# Altium PCB Orion_PCB.PcbDoc (part 1 of 2)
Units mil, origin at the board's own origin, x right, y up, seen from the top; angles counter-clockwise.
Board outline 3401 x 1998 mil, 2 copper layers (Top Layer, Bottom Layer); 64 components, 48 nets, 235 pads, 54 vias.
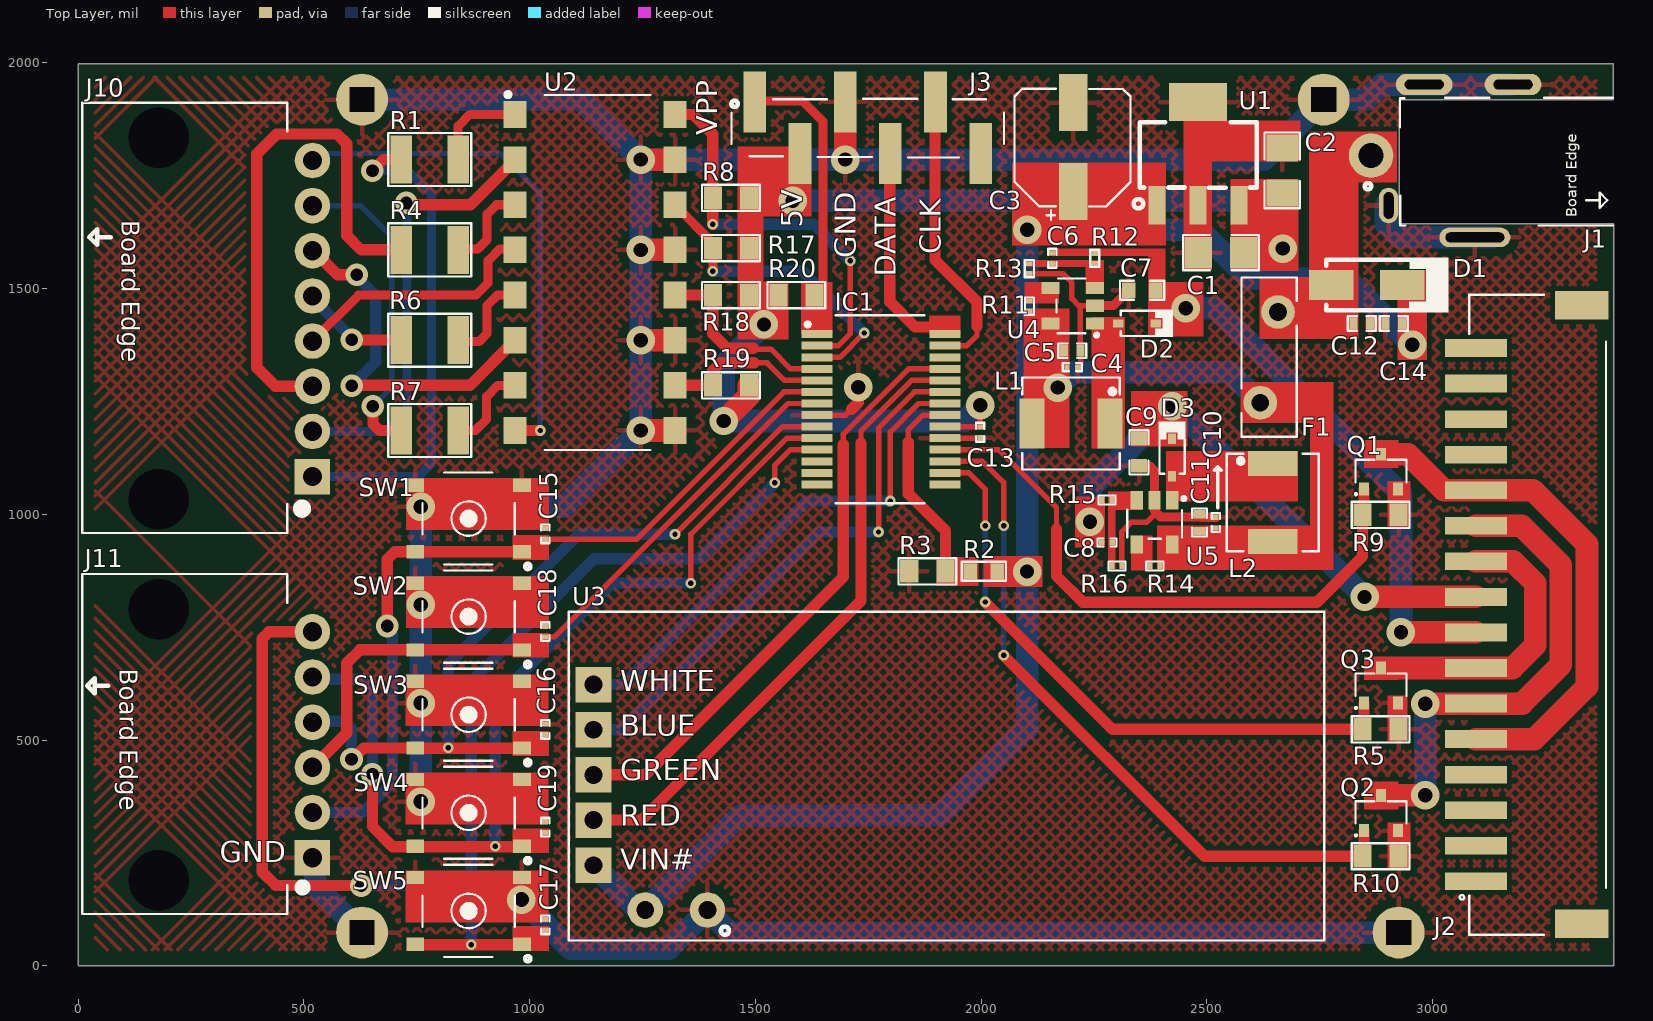
[diagram p0: Top Layer view]
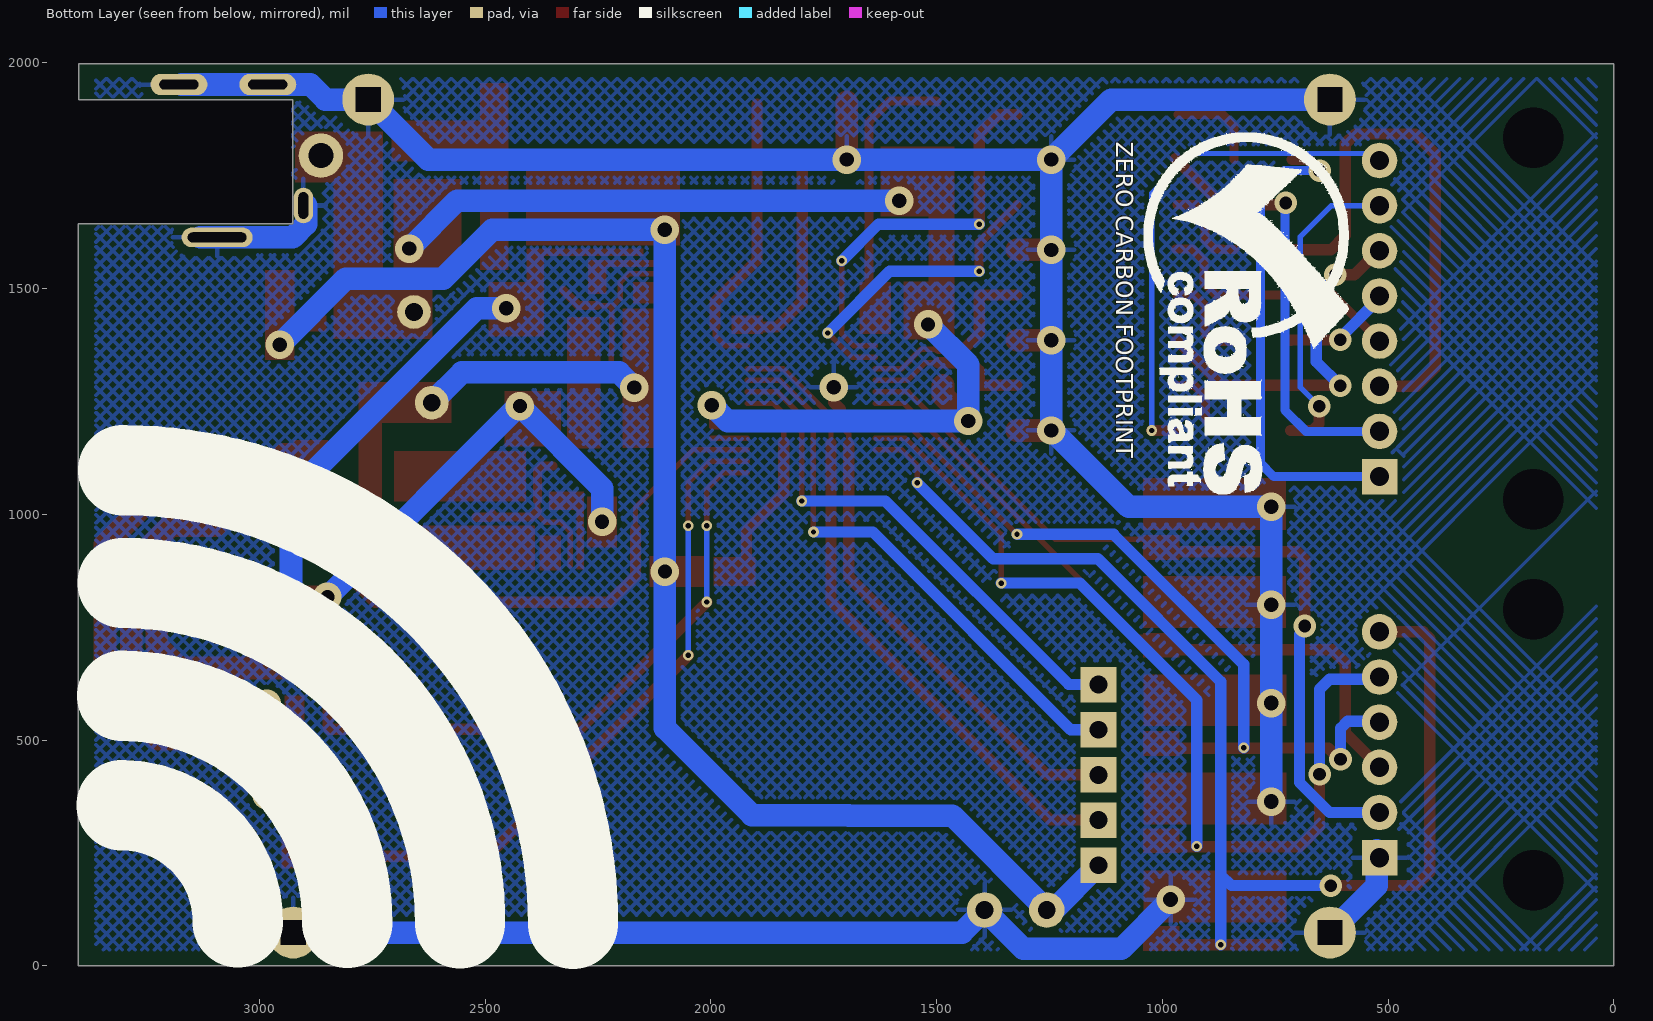
[diagram p1: Bottom Layer view, seen from below]
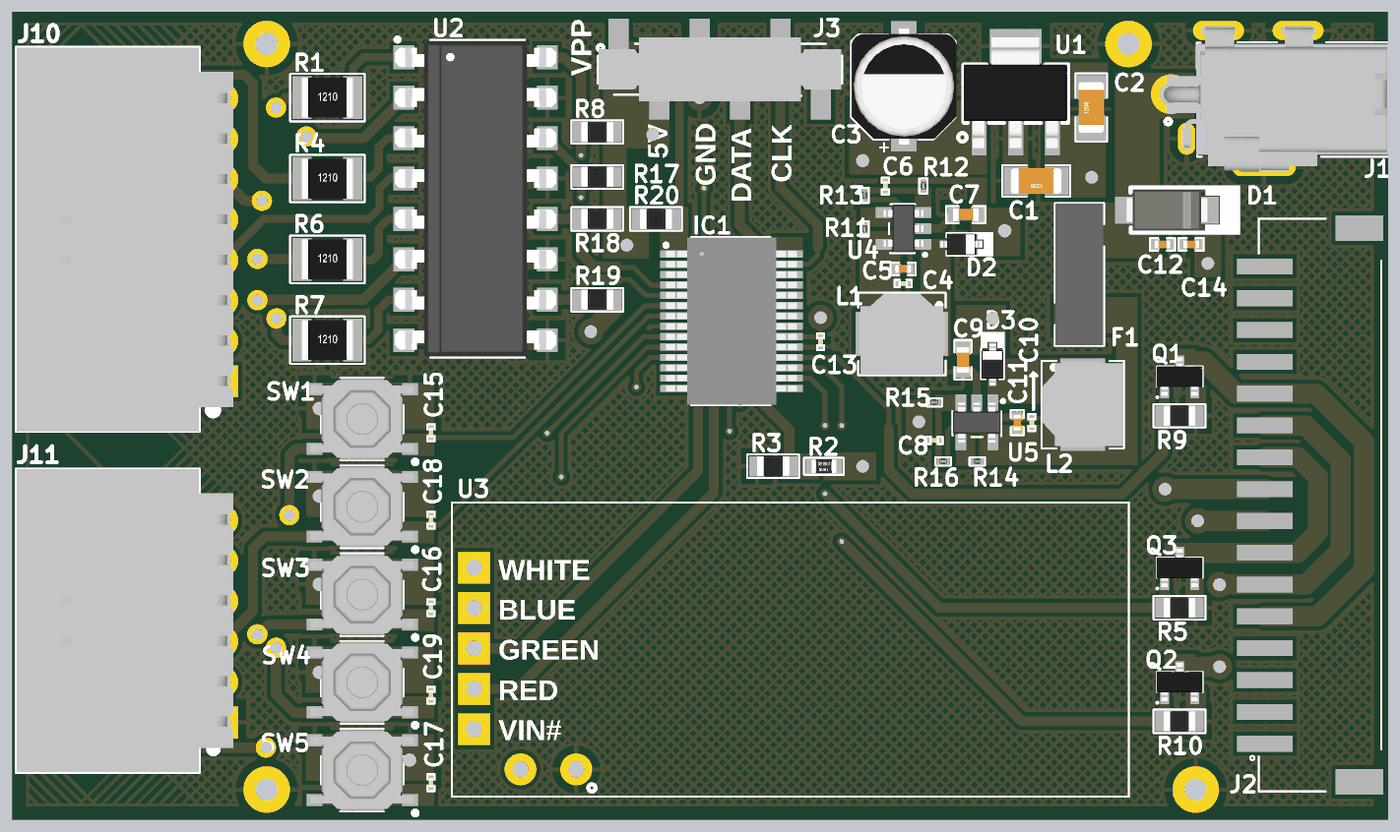
[diagram p2: 3D render of the assembled board from above, using the file's embedded part models]

## Layer stack, top to bottom
Top Solder: solder mask 0.4, Solder Resist, Dk 3.5
Top Layer: signal copper 1.4
Dielectric 1: dielectric 12.6, FR-4, Dk 4.8
Bottom Layer: signal copper 1.4
Bottom Solder: solder mask 0.4, Solder Resist, Dk 3.5

## Board outline
0,0 0,1998 3400,1998 3400,1919 2926,1919 2926,1644 3401,1644 3401,0

## Design rules (kind name [scope] priority, off if disabled: settings)
Clearance [All] p1: gap=7 ignorepadtopadclearanceinfootprint=FALSE except(10: Arc-Poly Track-Poly SMDPad-Poly THPad-Poly Via-Poly Fill-Poly Poly-Poly)
ComponentClearance [All] p1: gap=0 collisioncheckmode=3 verticalgap=0 showdistances=FALSE
Height [All] p1: minheight=0 maxheight=10000 prefheight=500
HoleSize [All] p1: absolutevalues=TRUE maxlimit=1000 minlimit=1 maxpercent=80.000 minpercent=20.000
HoleToHoleClearance [All] p1: gap=0 allowstackedmicrovias=TRUE
MinimumSolderMaskSliver [All] p1: minsoldermaskwidth=0
PlaneConnect [All] p1: planeconnectstyle=Relief reliefexpansion=20 reliefentries=4 reliefconductorwidth=10 reliefairgap=20
PolygonConnect [All] p1: connectstyle=Relief reliefconductorwidth=10 reliefentries=4 polygonreliefangle="90 Angle" airgapwidth=20
RoutingVias [All] p1: holewidth=11.81 width=23.62 viastyle="Through Hole" minholewidth=7.87 minwidth=15.75 maxholewidth=31.5 maxwidth=62.99
SilkToSilkClearance [All] p1: silktosilkclearance=0
SilkToSolderMaskClearance [IsPad] p1: minsilkscreentomaskgap=0 clearancetoexposedcopper=TRUE
SolderMaskExpansion SolderMaskExpansion_1 [Not IsVia] p1: expansion=4 istentingtop=FALSE
SolderMaskExpansion [IsVia] p2: expansion=4 istentingtop=FALSE soldermaskfromhole=TRUE
Width [All] p1: maxlimit=100 minlimit=10 preferedwidth=12 minimp=50.000000 maximp=50.000000 favimp=50.000000
22 further rules are at their usual default settings.

## Classes and differential pairs
component class U_Switching_Section: C15 C16 C17 C18 C19 Q1 Q2 Q3 R5 R9 R10 SW1 SW2 SW3 SW4 SW5
component class U_Processing_Section: C13 IC1 R1 R2 R3 R4 R6 R7 R8 R17 R18 R19 R20 U2
component class U_Power_Section: C1 C2 C3 C4 C5 C6 C7 C8 C9 C10 C11 D2 D3 L1 L2 R11 R12 R13 R14 R15 R16 U1 U4 U5
component class U_Connector_Section: C12 C14 D1 F1 J1 J2 J3 J10 J11 U3

## Components (designator, comment, footprint, x,y, rotation, side; value= is the part's Value field where it differs from the comment)
C1 "10000PF" Cap1206 2531,1580 r180 top locked
C2 "10000PF" Cap1206 2667,1762 r90 top locked
C3 "33uF" EEE-HB1E330AP 2204,1814 r90 top locked
C4 "0.1uF" "CAP 0201" 2202,1326.42 r0 top locked
C5 "2.2uF" Cap0402 2202,1362.42 r0 top locked
C6 "220pF" "CAP 0201" 2158,1567.42 r270 top locked
C7 "4.7uF" Cap0603 2356.88,1496.42 r180 top locked
C8 "220pF" "CAP 0201" 2279,938 r0 top locked
C9 "4.7uF" Cap0603 2350,1137.43 r270 top locked
C10 "0.1uF" "CAP 0201" 2520,982 r90 top locked
C11 "2.2uF" Cap0402 2484,982 r90 top locked
C12 "0.1uF" Cap0402 2843,1423 r0 top locked
C13 "0.1uF" "CAP 0201" 1998,1182 r270 top locked
C14 "0.1uF" Cap0402 2914,1423 r180 top locked
C15 "0.1uF" "CAP 0201" 1035,957 r90 top locked
C16 "0.1uF" "CAP 0201" 1035,524 r90 top locked
C17 "0.1uF" "CAP 0201" 1035,91 r90 top locked
C18 "0.1uF" "CAP 0201" 1035,740.5 r90 top locked
C19 "0.1uF" "CAP 0201" 1035,307.5 r90 top locked
D1 "M7" SMA 2854,1508 r0 top locked value=Custom
D2 "SDM2U20SD3-7" SDM2U20SD3-7 2345.46,1423.42 r0 top locked
D3 "SDM2U20SD3-7" SDM2U20SD3-7 2423,1126 r90 top locked
F1 "30R135UPR" 30R135UPR 2638,1348 r270 top locked
IC1 "PIC16F15355-I/SS" PIC16F15355-I/SS 1778,1233 r0 top locked
J1 "DC-C024E-7A-1.65" DC-C024E-7A-1.65 3021,1783 r180 top
J2 "0220164-162121" 0220164-162121 3213.13,778.07 r90 top locked
J3 "95293-401A06LF" 95293-401A06LF 1749,1856.48 r0 top locked
J10 "0705510042" 0705510042 61.08,1256 r270 top
J11 "0705510040" 0705510040 349.08,515 r270 top
L1 "10uH" SPM5012T-100M-LR 2199,1201.42 r180 top locked
L2 "10uH" SPM5012T-100M-LR 2646,1026.61 r270 top locked
Q1 "SQ2308CES-T1_BE3" SQ2308CES-T1_BE3 2848.2,1056 r0 top locked
Q2 "SQ2308CES-T1_BE3" SQ2308CES-T1_BE3 2848.2,300 r0 top locked
Q3 "SQ2308CES-T1_BE3" SQ2308CES-T1_BE3 2848.2,582.52 r0 top locked
R1 "560R" "RES 1210" 779,1786 r0 top locked
R2 "14K" Res0603 2006,874 r0 top locked
R3 "10K" "RES 0805" 1881,874 r180 top locked value=10kΩ
R4 "560R" "RES 1210" 779,1586 r0 top locked
R5 "10K" "RES 0805" 2885,524 r180 top locked value=10kΩ
R6 "560R" "RES 1210" 779,1386 r0 top locked
R7 "560R" "RES 1210" 779,1186 r0 top locked
R8 "10K" "RES 0805" 1446,1701 r180 top locked value=10kΩ
R9 "10K" "RES 0805" 2885,999 r180 top locked value=10kΩ
R10 "10K" "RES 0805" 2885,243 r180 top locked value=10kΩ
R11 "51K" Res-0201 2107,1461.42 r90 top locked
R12 "715K" Res-0201 2252,1567.42 r90 top locked
R13 "13K" Res-0201 2107,1544.42 r270 top locked
R14 "51K" Res-0201 2385,886 r180 top
R15 "715K" Res-0201 2279,1032 r180 top locked
R16 "13K" Res-0201 2301,886 r0 top
R17 "10K" "RES 0805" 1446,1590 r180 top locked value=10kΩ
R18 "10K" "RES 0805" 1446,1486 r180 top locked value=10kΩ
R19 "10K" "RES 0805" 1446,1286 r180 top locked value=10kΩ
R20 "10K" "RES 0805" 1591,1486 r0 top locked value=10kΩ
SW1 "TS-1187A-C-G-B" TS-1187A-C-G-B 865,991 r180 top locked
SW2 "TS-1187A-C-G-B" TS-1187A-C-G-B 865,773.75 r180 top locked
SW3 "TS-1187A-C-G-B" TS-1187A-C-G-B 865,556.5 r180 top locked
SW4 "TS-1187A-C-G-B" TS-1187A-C-G-B 865,339.25 r180 top locked
SW5 "TS-1187A-C-G-B" TS-1187A-C-G-B 865,122 r180 top locked
U1 "UA78M05IDCYR" UA78M05IDCYR 2480.45,1799.17 r0 top locked
U2 "LTV-844S" LTV-844S 1145.17,1536 r0 top locked
U3 "ESP8285" ESP8285 1141.64,623.21 r270 top locked
U4 "LMR62014XMF/NOPB" SOT23-5 2203,1462.42 r180 top locked
U5 "LMR62014XMF/NOPB" SOT23-5 2384,982.21 r270 top locked

## Footprints (in the part's own frame and the unit in brackets; to place one, negate y for a bottom-side part, rotate by r counter-clockwise, add the part's x,y. Pads: shape width x height; smd on the part's side, far side on the other; paste and mask are expansions set on the pad)
30R135UPR [mm]
  round 1.894 hole 1: 1(-2.55,0.5) 2(2.55,-0.5)
  silkscreen extent -4.5,-1.55 4.47,1.55, body extent -4.48,-1.5 4.42,1.5, height 13.6
95293-401A06LF [mm]
  rect 1.27x3.43 smd: 1(-6.35,1.46) 2(-3.81,-1.46) 3(-1.27,1.46) 4(1.27,-1.46) 5(3.81,1.46) 6(6.35,-1.46)
  silkscreen extent -7.67,-1.68 7.67,1.63, body extent -7.62,-2.64 7.62,2.64, height 9.65
0220164-162121 [mm]
  rect 1x3.5 smd: 1(-15,2.975) 2(-13,2.975) 3(-11,2.975) 4(-9,2.975) 5(-7,2.975) 6(-5,2.975) 7(-3,2.975) 8(-1,2.975) 9(1,2.975) 10(3,2.975) 11(5,2.975) 12(7,2.975) 13(9,2.975) 14(11,2.975) 15(13,2.975) 16(15,2.975)
  rect 1.6x3 smd: MP1(-17.4,-2.975) MP2(17.4,-2.975)
  silkscreen extent -18,-4.35 18,3.89
0705510040 [mm]
  rect 2x2 hole 1.09: 1(6.985,4.32)
  round 2 hole 1.09: 2(4.445,4.32) 3(1.905,4.32) 4(-0.635,4.32) 5(-3.175,4.32) 6(-5.715,4.32)
  round 0 hole 3.4 unplated: MH1(-6.985,-4.32) MH2(8.255,-4.32)
  silkscreen extent -8.97,-8.64 10.16,3.96, body extent -8.94,-8.58 10.11,5, height 7.06
0705510042 [mm]
  rect 2x2 hole 1.09: 1(4.369,11.635)
  round 2 hole 1.09: 2(1.829,11.635) 3(-0.711,11.635) 4(-3.251,11.635) 5(-5.791,11.635) 6(-8.331,11.635) 7(-10.871,11.635) 8(-13.411,11.635)
  round 0 hole 3.4 unplated: MH1(-14.681,2.995) MH2(5.639,2.995)
  silkscreen extent -16.66,-1.32 7.54,11.31, body extent -16.61,-1.27 7.52,12.32, height 7.06
Cap0402 [mil]
  rect 18x25 smd mask+2.36: 1(-18.5,0) 2(18.5,0)
  silkscreen extent -31,-16 31,16, body extent -20,-10 20,10, height 19
Cap0603 [mil]
  rect 30x35 smd mask+2.36: 1(-30,0) 2(30,0)
  silkscreen extent -49,-21 49,21, body extent -32,-16 31,16, height 34
Cap1206 [mil] "SMD 1206"
  rect 60x70 smd: 1(-50,0) 2(50,0)
  silkscreen extent -84,-39 84,39, body extent -63,-31 63,32, height 39
"CAP 0201" [mm]
  rect 0.3x0.3 smd mask+0.055: 1(-0.3,0) 2(0.3,0)
  silkscreen extent -0.53,-0.23 0.53,0.23, body extent -0.3,-0.15 0.3,0.15, height 0.28
DC-C024E-7A-1.65 [mm]
  round 2.5 hole 1.4: 1(3.995,-0.3)
  oval 4x1.1 hole 0.55 slot 3.3 at 0 deg: 2(-1.845,4.3)
  oval 1.1x2 hole 0.55 slot 1.5 at 90 deg: 3(3.005,2.507)
  oval 3.2x1.2 hole 0.55 slot 2.2 at 0 deg: 4(-3.995,-4.3) 5(1.005,-4.3)
  silkscreen extent -9.6,-3.56 4.34,3.63, body extent -9.57,-4.48 4.43,4.52, height 5.05
EEE-HB1E330AP [mm] "CAP ALUM 33UF 20% 25V SMD"
  rect 3.2x1.6 smd: 1(-2.5,0) 2(2.5,0)
  silkscreen extent -4.1,-3.23 3.27,3.3, body extent -3.65,-3.3 3.65,3.3, height 5.8
ESP8285 [mm]
  round 2 hole 1: 1(12.68,6.41) 2(12.68,2.91)
  rect 2x2 hole 1: 3(10.16,0) 4(7.62,0) 5(5.08,0) 6(2.54,0) 7(0,0)
  silkscreen extent -4.1,-1.4 14.4,41.1
LTV-844S [mm]
  rect 1.3x1.5 smd: 1(-4.5,8.89) 2(-4.5,6.35) 3(-4.5,3.81) 4(-4.5,1.27) 5(-4.5,-1.27) 6(-4.5,-3.81) 7(-4.5,-6.35) 8(-4.5,-8.89) 9(4.5,-8.89) 10(4.5,-6.35) 11(4.5,-3.81) 12(4.5,-1.27) 13(4.5,1.27) 14(4.5,3.81) 15(4.5,6.35) 16(4.5,8.89)
  silkscreen extent -5.03,-9.98 3.1,10.14, body extent -5.08,-9.92 5.08,9.92, height 4.6
PIC16F15355-I/SS [mm]
  rect 1.75x0.45 smd: 1(-3.6,4.225) 2(-3.6,3.575) 3(-3.6,2.925) 4(-3.6,2.275) 5(-3.6,1.625) 6(-3.6,0.975) 7(-3.6,0.325) 8(-3.6,-0.325) 9(-3.6,-0.975) 10(-3.6,-1.625) 11(-3.6,-2.275) 12(-3.6,-2.925) 13(-3.6,-3.575) 14(-3.6,-4.225) 15(3.6,-4.225) 16(3.6,-3.575) 17(3.6,-2.925) 18(3.6,-2.275) 19(3.6,-1.625) 20(3.6,-0.975) 21(3.6,-0.325) 22(3.6,0.325) 23(3.6,0.975) 24(3.6,1.625) 25(3.6,2.275) 26(3.6,2.925) 27(3.6,3.575) 28(3.6,4.225)
  silkscreen extent -4.22,-5.28 2.44,5.28, body extent -4.1,-5.24 4.1,5.24, height 2.01
Res0603 [mil]
  rect 30x35 smd: 1(-30,0) 2(30,0)
  silkscreen extent -49,-21 49,21, body extent -31,-17 31,17, height 18
"RES 0805" [mil] "SMD 0805"
  rect 40x50 smd: 1(-40,0) 2(40,0)
  silkscreen extent -64,-29 64,29, body extent -39,-25 39,24, height 24
"RES 1210" [mm] "560 OHM"
  rect 1.2x2.7 smd: 1(-1.6,0) 2(1.6,0)
  silkscreen extent -2.34,-1.49 2.34,1.49, body extent -1.6,-1.25 1.6,1.25, height 0.6
Res-0201 [mm]
  rect 0.27x0.37 smd: 1(-0.275,0) 2(0.275,0)
  silkscreen extent -0.48,-0.25 0.48,0.25, body extent -0.3,-0.15 0.3,0.15, height 0.29
SDM2U20SD3-7 [mm]
  rect 0.59x0.45 smd: 1(-1.055,0) 2(1.055,0)
  silkscreen extent -0.91,-0.76 2.03,0.76, body extent -1.3,-0.68 1.3,0.67, height 1.1
SMA [mm] "DIODE GEN PURP 50V 1A SMA"
  rect 2.5x1.7 smd: 1(-2,0) 2(2,0)
  silkscreen extent -2.29,-1.55 4.6,1.55, body extent -2.6,-1.3 2.6,1.3, height 2.3
SOT23-5 [mil] "SOT23-5 Package"
  rect 40x27 smd: 1(-49.21,39.37) 2(-49.21,0) 3(-49.21,-39.37) 4(49.21,-39.37) 5(49.21,39.37)
  silkscreen extent -56,-60 36,68, body extent -49,-59 49,59, height 43
SPM5012T-100M-LR [mm]
  rect 1.4x2.8 smd: 1(-2.2,0) 2(2.2,0)
  silkscreen extent -2.74,-2.59 2.74,2.59, body extent -2.7,-2.55 2.7,2.55, height 1.16
SQ2308CES-T1_BE3 [mm] "MOSFET N-CHANNEL 60V (D-S)"
  rect 0.559x0.724 smd: 1(0,0) 2(1.9,0) 3(0.95,1.968)
  silkscreen extent -0.51,-0.34 2.39,1.65, body extent -0.51,-0.18 2.39,2.22, height 1.1
TS-1187A-C-G-B [mm]
  rect 1x0.75 smd: 1(-3,1.875) 2(3,1.875) 3(-3,-1.875) 4(3,-1.875)
  silkscreen extent -3.48,-2.59 2.59,2.84, body extent -3.25,-2.55 3.25,2.55, height 3.5
UA78M05IDCYR [mm]
  rect 0.95x2.15 smd: 1(-2.3,-2.9) 2(0,-2.9) 3(2.3,-2.9)
  rect 3.25x2.15 smd: 4(0,2.9)
  silkscreen extent -3.62,-3.08 3.3,1.75, body extent -3.28,-3.51 3.22,3.45, height 1.65

## Part data
C1: library part CC1206KRX7R0BB103, "CAP CER 10000PF 100V X7R 1206", Capacitance=10nF, Case/Package=1206, Case Code (Metric)=3216, Dielectric=X7R, Insulation Resistance=10GR, Manufacturer=Yageo, Max Operating Temperature=125°C, Min Operating Temperature=-55°C, Package Quantity=4000, Resistor Type=Ceramic, Supplier Part Number 1=311-1985-1-ND, Tolerance=10%, Voltage=100V, Case Code (Imperial)=1206, Category="Ceramic Capacitors", ComponentLink1Description=https://datasheet.ciiva.com/15375/upy-gp-np0-16v-to-50v-8-15375877.pdf?src-supplier=Mouser, ComponentLink1URL=https://datasheet.ciiva.com/15375/upy-gp-np0-16v-to-50v-8-15375877.pdf?src-supplier=Mouser, ComponentLink2Description=https://datasheet.ciiva.com/16744/upy-np0x7r-mv-100-to-630v-9-16744582.pdf?src-supplier=Future+Electronics, ComponentLink2URL=https://datasheet.ciiva.com/16744/upy-np0x7r-mv-100-to-630v-9-16744582.pdf?src-supplier=Future+Electronics, ComponentLink3Description=https://datasheet.ciiva.com/15189/getdatasheetpartid-315568-15189269.pdf?src-supplier=Verical, ComponentLink3URL=https://datasheet.ciiva.com/15189/getdatasheetpartid-315568-15189269.pdf?src-supplier=Verical, ComponentLink4Description=https://datasheet.ciiva.com/16624/upy-np0x7r-mv-100-to-630v-9-16624629.pdf?src-supplier=Avnet+Europe, ComponentLink4URL=https://datasheet.ciiva.com/16624/upy-np0x7r-mv-100-to-630v-9-16624629.pdf?src-supplier=Avnet+Europe, ComponentLink5Description=https://datasheet.ciiva.com/11466/upy-np0x7r-mv-100-to-630v-9-11466717.pdf?src-supplier=Avnet, ComponentLink5URL=https://datasheet.ciiva.com/11466/upy-np0x7r-mv-100-to-630v-9-11466717.pdf?src-supplier=Avnet, Depth=1.6mm, Dissipation Factor=2.5%, Height=0.85mm, Lead Free="Lead Free", Length=3.2mm, Manufacturer Part Number=CC1206KRX7R0BB103, Mount="Surface Mount", Number of Pins=2, Packaging="Tape and Reel", Pricing 1="1=0.28000, 10=0.18900, 50=0.11320, 100=0.09560, 500=0.06542, 1000=0.05787 (USD)", Radiation Hardening=No, RoHS=Yes, RoHS Compliant=Yes, Series=CC, Stock 1=7045, Supplier 1=Digi-Key, Termination=SMD/SMT, Thickness=0.057inch, Voltage Rating=100V, Voltage Rating (DC)=100V, Width=1.6mm
C2: library part CC1206KRX7R0BB103, "CAP CER 10000PF 100V X7R 1206", Capacitance=10nF, Case Code (Imperial)=1206, Case Code (Metric)=3216, Dielectric=X7R, Insulation Resistance=10GR, Manufacturer=Yageo, Max Operating Temperature=125°C, Min Operating Temperature=-55°C, Package Quantity=4000, Resistor Type=Ceramic, Supplier Part Number 1=311-1985-1-ND, Tolerance=10%, Voltage=100V, Case/Package=1206, Category="Ceramic Capacitors", ComponentLink1Description=https://datasheet.ciiva.com/15375/upy-gp-np0-16v-to-50v-8-15375877.pdf?src-supplier=Mouser, ComponentLink1URL=https://datasheet.ciiva.com/15375/upy-gp-np0-16v-to-50v-8-15375877.pdf?src-supplier=Mouser, ComponentLink2Description=https://datasheet.ciiva.com/16744/upy-np0x7r-mv-100-to-630v-9-16744582.pdf?src-supplier=Future+Electronics, ComponentLink2URL=https://datasheet.ciiva.com/16744/upy-np0x7r-mv-100-to-630v-9-16744582.pdf?src-supplier=Future+Electronics, ComponentLink3Description=https://datasheet.ciiva.com/15189/getdatasheetpartid-315568-15189269.pdf?src-supplier=Verical, ComponentLink3URL=https://datasheet.ciiva.com/15189/getdatasheetpartid-315568-15189269.pdf?src-supplier=Verical, ComponentLink4Description=https://datasheet.ciiva.com/16624/upy-np0x7r-mv-100-to-630v-9-16624629.pdf?src-supplier=Avnet+Europe, ComponentLink4URL=https://datasheet.ciiva.com/16624/upy-np0x7r-mv-100-to-630v-9-16624629.pdf?src-supplier=Avnet+Europe, ComponentLink5Description=https://datasheet.ciiva.com/11466/upy-np0x7r-mv-100-to-630v-9-11466717.pdf?src-supplier=Avnet, ComponentLink5URL=https://datasheet.ciiva.com/11466/upy-np0x7r-mv-100-to-630v-9-11466717.pdf?src-supplier=Avnet, Depth=1.6mm, Dissipation Factor=2.5%, Height=0.85mm, Lead Free="Lead Free", Length=3.2mm, Manufacturer Part Number=CC1206KRX7R0BB103, Mount="Surface Mount", Number of Pins=2, Packaging="Tape and Reel", Pricing 1="1=0.28000, 10=0.18900, 50=0.11320, 100=0.09560, 500=0.06542, 1000=0.05787 (USD)", Radiation Hardening=No, RoHS=Yes, RoHS Compliant=Yes, Series=CC, Stock 1=7045, Supplier 1=Digi-Key, Termination=SMD/SMT, Thickness=0.057inch, Voltage Rating=100V, Voltage Rating (DC)=100V, Width=1.6mm
C3: library part EEE-HB1E330AP, "CAP ALUM 33UF 20% 25V SMD", Case/Package=Radial, Leakage Current=3uA, Manufacturer=Panasonic, Max Operating Temperature=105°C, Min Operating Temperature=-40°C, Package Quantity=1, Ripple Current=65mA, Supplier Part Number 1=PCE4755CT-ND, Tolerance=20%, Voltage=25V, Capacitance=33uF, Category="Aluminum Electrolytic Capacitors", ComponentLink1Description=https://datasheet.ciiva.com/11780/0900766b80bed47d-11780811.pdf?src-supplier=RSComponents, ComponentLink1URL=https://datasheet.ciiva.com/11780/0900766b80bed47d-11780811.pdf?src-supplier=RSComponents, ComponentLink2Description=https://datasheet.ciiva.com/2985/aba0000ce117-2985840.pdf?src-supplier=Avnet, ComponentLink2URL=https://datasheet.ciiva.com/2985/aba0000ce117-2985840.pdf?src-supplier=Avnet, ComponentLink3Description=https://datasheet.ciiva.com/17536/aba0000ce117-17536184.pdf?src-supplier=Avnet+Europe, ComponentLink3URL=https://datasheet.ciiva.com/17536/aba0000ce117-17536184.pdf?src-supplier=Avnet+Europe, ComponentLink4Description=https://datasheet.ciiva.com/10331/aba0000ce117-10331117.pdf?src-supplier=Avnet, ComponentLink4URL=https://datasheet.ciiva.com/10331/aba0000ce117-10331117.pdf?src-supplier=Avnet, Construction=Cylindrical, Diameter=6.3mm, Height=5.8mm, Height - Seated (Max)=0.228inch, Lead Free="Lead Free", Length=6.1mm, Life (Hours)=2000Hour, Manufacturer Part Number=EEE-HB1E330AP, Mount="Surface Mount", Packaging="Tape and Reel", Pricing 1="1=0.52000, 10=0.35900, 50=0.25160, 100=0.21560, 500=0.16172 (USD)", Radiation Hardening=No, RoHS=Yes, RoHS Compliant=Yes, Series=HB, Stock 1=27, Supplier 1=Digi-Key, Termination=SMD/SMT, Voltage Rating=25V, Voltage Rating (DC)=25V
C4 C10 C13 C15 C16 C17 C18 C19: library part GRM033R61E104KE14D, "CAP CER 0.1UF 25V X5R 0201", Capacitance=100nF, Case Code (Imperial)=0201, Case Code (Metric)=0603, Dielectric=X5R, Manufacturer=Murata, Max Operating Temperature=85°C, Min Operating Temperature=-55°C, Package Quantity=15000, Resistor Type=Ceramic, Supplier Part Number 1=81-GRM033R61E104KE4D, Tolerance=10%, Voltage Rating=25V, Case/Package=0201, Category="Ceramic Capacitors", ComponentLink1Description=http://www.farnell.com/datasheets/2867843.pdf?src-supplier=Farnell, ComponentLink1URL=http://www.farnell.com/datasheets/2867843.pdf?src-supplier=Farnell, ComponentLink2Description=http://www.mouser.com/ds/2/281/c02e-2905.pdf?src-supplier=Mouser, ComponentLink2URL=http://www.mouser.com/ds/2/281/c02e-2905.pdf?src-supplier=Mouser, ComponentLink3Description=http://search.murata.co.jp/Ceramy/image/img/A01X/G101/ENG/GRM033R61E104KE14-01.pdf?src-supplier=Digi-Key, ComponentLink3URL=http://search.murata.co.jp/Ceramy/image/img/A01X/G101/ENG/GRM033R61E104KE14-01.pdf?src-supplier=Digi-Key, ComponentLink4Description=http://www.farnell.com/datasheets/2867843.pdf?src-supplier=Newark, ComponentLink4URL=http://www.farnell.com/datasheets/2867843.pdf?src-supplier=Newark, Height=0.3mm, Lead Free="Lead Free", Length=0.024inch, Manufacturer Part Number=GRM033R61E104KE14D, Mount="Surface Mount", Packaging="Tape and Reel", Pricing 1="1=0.12000, 10=0.05600, 50=0.05600, 100=0.02500, 1000=0.01400, 10000=0.01100 (USD)", RoHS=Yes, RoHS Compliant=Yes, Stock 1=19728, Supplier 1=Mouser, Termination=SMD/SMT, Thickness=0.013inch, Voltage Rating (DC)=25V, Weight=1.2E-05oz, Width=0.012inch
C5 C11: library part C1005X5R1E225KT000E, "CAP CER 2.2UF 25V X5R 0402", Case Code (Imperial)=0402, Case Code (Metric)=1005, Dielectric=X5R, Dielectric Material=Ceramic, Manufacturer=TDK, Manufacturer Part Number=C1005X5R1E225K050BC, Max Operating Temperature=85°C, Min Operating Temperature=-55°C, Package Quantity=1, Supplier Part Number 1=445-9090-1-ND, Tolerance=10%, Voltage Rating=25V, Capacitance=2.2uF, Case/Package=0402, Category="Ceramic Capacitors", ComponentLink1Description=https://datasheet.ciiva.com/24217/c1005x5r1e225k050bc-264404-24217075.pdf?src-supplier=Mouser, ComponentLink1URL=https://datasheet.ciiva.com/24217/c1005x5r1e225k050bc-264404-24217075.pdf?src-supplier=Mouser, ComponentLink2Description=https://datasheet.ciiva.com/6276/tdkmlcccaprange-6276808.pdf?src-supplier=Digi-Key, ComponentLink2URL=https://datasheet.ciiva.com/6276/tdkmlcccaprange-6276808.pdf?src-supplier=Digi-Key, ComponentLink3Description=https://datasheet.ciiva.com/6276/tdkmlcccaprange-6276806.pdf?src-supplier=Digi-Key, ComponentLink3URL=https://datasheet.ciiva.com/6276/tdkmlcccaprange-6276806.pdf?src-supplier=Digi-Key, ComponentLink4Description=https://datasheet.ciiva.com/6276/tdkmlcccaprange-6276810.pdf?src-supplier=Digi-Key, ComponentLink4URL=https://datasheet.ciiva.com/6276/tdkmlcccaprange-6276810.pdf?src-supplier=Digi-Key, Depth=0.5mm, Height=0.5mm, Lead Free="Lead Free", Length=1mm, Mount="Surface Mount", Packaging="Tape and Reel", Pricing 1="1=0.31000, 10=0.21000, 50=0.13980, 100=0.11890, 500=0.08390, 1000=0.07342, 2500=0.06992, 5000=0.06468 (USD)", REACH SVHC="No SVHC", Resistor Type=Ceramic, RoHS=Yes, RoHS Compliant=Yes, Series=C, Stock 1=655450, Supplier 1=Digi-Key, Termination=SMD/SMT, Thickness=0.022inch, Voltage Rating (DC)=25V, Weight=2.3E-05oz, Width=0.5mm
C6 C8: library part C0603X7R221KGT, "50V 220pF X7R ±10% 0201 Multilayer Ceramic Capacitors MLCC - SMD/SMT ROHS", Manufacturer="Darfon Elec", ComponentLink1Description="New link", ComponentLink1URL=https://www.lcsc.com/product-detail/Multilayer-Ceramic-Capacitors-MLCC-SMD-SMT_Darfon-Elec-C0603X7R221KGT_C258475.html, Manufacturer Part No=C0603X7R221KGT
C7 C9: library part C1608X5R1E475K080AC, "CAP CER 4.7UF 25V X5R 0603", Case Code (Imperial)=0603, Case Code (Metric)=1608, Dielectric=X5R, Dielectric Material=Ceramic, Manufacturer=TDK, Max Operating Temperature=85°C, Min Operating Temperature=-55°C, Package Quantity=4000, Supplier Part Number 1=445-9050-1-ND, Tolerance=10%, Voltage Rating=25V, Capacitance=4.7uF, Case/Package=0603, Category="Ceramic Capacitors", ComponentLink1Description=https://datasheet.ciiva.com/48587/6print-detail-pdf-phplangenpart-noc1608x5r1e475k080acimp-unit-xmhz-48587141.pdf?src-supplier=Onlinecomponents.com, ComponentLink1URL=https://datasheet.ciiva.com/48587/6print-detail-pdf-phplangenpart-noc1608x5r1e475k080acimp-unit-xmhz-48587141.pdf?src-supplier=Onlinecomponents.com, ComponentLink2Description=https://datasheet.ciiva.com/24216/mlcc-commercial-general-en-24216326.pdf?src-supplier=Mouser, ComponentLink2URL=https://datasheet.ciiva.com/24216/mlcc-commercial-general-en-24216326.pdf?src-supplier=Mouser, ComponentLink3Description=https://datasheet.ciiva.com/48671/mlcc-commercial-general-en-48671304.pdf?src-supplier=Avnet, ComponentLink3URL=https://datasheet.ciiva.com/48671/mlcc-commercial-general-en-48671304.pdf?src-supplier=Avnet, Depth=0.8mm, Height=0.8mm, Lead Free="Lead Free", Length=1.6mm, Manufacturer Part Number=C1608X5R1E475K080AC, Mount="Surface Mount", Packaging="Tape and Reel", Pricing 1="1=0.36000, 10=0.25000, 50=0.17460, 100=0.14970, 500=0.11230, 1000=0.09483 (USD)", REACH SVHC="No SVHC", Resistor Type=Ceramic, RoHS=Yes, Stock 1=495198, Supplier 1=Digi-Key, Termination=SMD/SMT, Thickness=0.039inch, Voltage Rating (DC)=25V, Weight=7.1E-05oz, Width=0.031inch
C12 C14: library part C1005X5R1H104K050BB, "CAP CER 0.1UF 50V X5R 0402", Capacitance=100nF, Case Code (Imperial)=0402, Case Code (Metric)=1005, Dielectric=X5R, Dielectric Material=Ceramic, Manufacturer=TDK, Max Operating Temperature=85°C, Min Operating Temperature=-55°C, Package Quantity=1, Supplier Part Number 1=445-5942-1-ND, Tolerance=10%, Voltage=50V, Case/Package=0402, ComponentLink1Description=https://product.tdk.com/info/en/catalog/spec/mlccspec_commercial_general_midvoltage_en.pdf?src-supplier=Digi-Key, ComponentLink1URL=https://product.tdk.com/info/en/catalog/spec/mlccspec_commercial_general_midvoltage_en.pdf?src-supplier=Digi-Key, ComponentLink2Description=http://www.tdk.co.jp/tefe02/e413_c.pdf?src-supplier=Future+Electronics, ComponentLink2URL=http://www.tdk.co.jp/tefe02/e413_c.pdf?src-supplier=Future+Electronics, ComponentLink3Description=https://www.verical.com/server-webapp/html/getDatasheet?partID=743571&src-supplier=Verical, ComponentLink3URL=https://www.verical.com/server-webapp/html/getDatasheet?partID=743571&src-supplier=Verical, ComponentLink4Description=http://www.tdk.co.jp/tefe02/e412_c.pdf?src-supplier=Avnet+Europe, ComponentLink4URL=http://www.tdk.co.jp/tefe02/e412_c.pdf?src-supplier=Avnet+Europe, Construction=Flat, Depth=0.5mm, Height=0.5mm, Lead Free="Lead Free", Length=1mm, Manufacturer Part Number=C1005X5R1H104K050BB, Mount="Surface Mount", Packaging="Tape and Reel", Pricing 1="1=0.12, 10=0.09, 50=0.049, 100=0.04, 500=0.02858, 1000=0.02245, 2500=0.02041, 5000=0.01878 (USD)", Radiation Hardening=No, REACH SVHC="No SVHC", Resistor Type=Ceramic, RoHS Compliant=Yes, Series=C, Stock 1=1455182, Supplier 1=Digi-Key, Termination=SMD/SMT, Thickness=0.022inch, Voltage Rating=50V, Voltage Rating (DC)=50V, Weight=2.3E-05oz, Width=0.02inch
D1: "1A 5μA 1kV 1kV 1.1V 1A SMA(DO-214AC) Diodes - General Purpose ROHS", Manufacturer=Slkor, Package=SMA, ComponentLink1Description=LCSC, ComponentLink1URL=https://lcsc.com/product-detail/Diodes-General-Purpose_Slkor-SLKORMICRO-Elec-M7_C426571.html, Manufacturer Part No=M7
D2 D3: "DIODE SCHOTTKY 20V 2A SOD323", Average Rectified Current=2A, Manufacturer=Diodes, Max Reverse Voltage (DC)=20V, Supplier Part Number 1=SDM2U20SD3-7DICT-ND, Category="Rectifier Diodes", ComponentLink1Description=http://www.mouser.com/ds/2/115/SDM2U20SD3-537776.pdf?src-supplier=Mouser, ComponentLink1URL=http://www.mouser.com/ds/2/115/SDM2U20SD3-537776.pdf?src-supplier=Mouser, ComponentLink2Description=https://www.diodes.com/assets/Datasheets/SDM2U20SD3.pdf?src-supplier=Digi-Key, ComponentLink2URL=https://www.diodes.com/assets/Datasheets/SDM2U20SD3.pdf?src-supplier=Digi-Key, ComponentLink3Description=http://diodes.com/datasheets/SDM2U20SD3.pdf?src-supplier=Avnet, ComponentLink3URL=http://diodes.com/datasheets/SDM2U20SD3.pdf?src-supplier=Avnet, Manufacturer Part Number=SDM2U20SD3-7, Mount="Surface Mount", Packaging="Cut Tape", Pricing 1="1=0.47000, 10=0.35200, 100=0.19930, 500=0.13200, 1000=0.10120 (USD)", RoHS=Yes, RoHS Compliant=Yes, Stock 1=6, Supplier 1=Digi-Key
F1: "PTC RESET FUSE 30V 1.35A RADIAL", Case/Package=Radial, Current Rating=40A, Hold Current=1.35A, Manufacturer=Littelfuse, Max Operating Temperature=85°C, Max Voltage Rating (DC)=30V, Min Operating Temperature=-40°C, Package Quantity=2000, Power Dissipation=800mW, Resistance=130mR, Supplier Part Number 1=576-30R135UPR, Trip Current=2.7A, Approvals=cULus,TUV, Category="PTC Resettable Fuses", ComponentLink1Description=https://datasheet.ciiva.com/325/littelfuse-ptc-30r-325859.pdf?src-supplier=Digi-Key, ComponentLink1URL=https://datasheet.ciiva.com/325/littelfuse-ptc-30r-325859.pdf?src-supplier=Digi-Key, ComponentLink2Description=https://datasheet.ciiva.com/325/littelfuse-ptc-30r-325860.pdf?src-supplier=Digi-Key, ComponentLink2URL=https://datasheet.ciiva.com/325/littelfuse-ptc-30r-325860.pdf?src-supplier=Digi-Key, ComponentLink3Description=https://datasheet.ciiva.com/14119/gklittelfuse-30r-e-14119724.pdf?src-supplier=Distrelec, ComponentLink3URL=https://datasheet.ciiva.com/14119/gklittelfuse-30r-e-14119724.pdf?src-supplier=Distrelec, Height=13.5mm, Lead Free="Lead Free", Lead Pitch=5.1mm, Manufacturer Part Number=30R135UPR, Max Current Rating=40A, Packaging="Tape and Reel", Pricing 1="1=0.53000, 10=0.42700, 50=0.42700, 100=0.32300, 1000=0.24200, 10000=0.23100 (USD)", RoHS=Yes, RoHS Compliant=Yes, Series="POLY-FUSE®, 30R", Stock 1=4973, Supplier 1=Mouser, Termination=Radial, Thickness=3.05mm, Time to Trip=7.3s, Width=8.89mm
IC1: "IC MCU 8BIT 14KB FLASH 28SSOP", Case/Package=SSOP, Frequency=32MHz, Manufacturer=Microchip, Max Operating Temperature=85°C, Min Operating Temperature=-40°C, Supplier Part Number 1=PIC16F15355-I/SS-ND, Category=Microcontrollers, ComponentLink1Description=http://www.microchip.com/mymicrochip/filehandler.aspx?ddocname=en585524&src-supplier=Digi-Key, ComponentLink1URL=http://www.microchip.com/mymicrochip/filehandler.aspx?ddocname=en585524&src-supplier=Digi-Key, Core Architecture=PIC, Interface=I2C,SPI,UART,USART, Manufacturer Part Number=PIC16F15355-I/SS, Memory Size=14KB, Memory Type=FLASH, Number of I/Os=25, Oscillator Type=Internal, Packaging=Rail/Tube, Peripherals="Brown-out Detect/Reset,POR,PWM,WDT", Pricing 1="1=1.39000, 25=1.27640, 100=1.15500 (USD)", RoHS=Yes, RoHS Compliant=Yes, Stock 1=36, Supplier 1=Digi-Key
J1: "DC Power Receptacle 1.65mm 4.3mm 7A 24V Plugin AC/DC Power Connectors ROHS", Package=Custom, Manfacturer="XKB Connectivity", Maunfacturer Part No=DC-C024E-7A-1.65
J2: "16 Pin Right angle JST Conn 2 mm Pitch", ComponentLink1Description=Datasheet, ComponentLink1URL=http://www.kaweei.com/indexdata/pic/2017072520595473499.pdf
J3: "CONN HEADER SMD 6POS 2.54MM", Color=Black, Manufacturer="Amphenol ICC / FCI", Max Operating Temperature=125°C, Max Voltage Rating (AC)=1.5kV, Min Operating Temperature=-65°C, Package Quantity=520, Supplier Part Number 1=609-4398-1-ND, Category="Headers and Wire Housings", ComponentLink1Description=https://datasheet.ciiva.com/739/95293-739282.pdf?src-supplier=Digi-Key, ComponentLink1URL=https://datasheet.ciiva.com/739/95293-739282.pdf?src-supplier=Digi-Key, ComponentLink2Description=https://datasheet.ciiva.com/739/95293-739276.pdf?src-supplier=Digi-Key, ComponentLink2URL=https://datasheet.ciiva.com/739/95293-739276.pdf?src-supplier=Digi-Key, ComponentLink3Description=https://datasheet.ciiva.com/739/95293-739268.pdf?src-supplier=Digi-Key, ComponentLink3URL=https://datasheet.ciiva.com/739/95293-739268.pdf?src-supplier=Digi-Key, ComponentLink4Description=https://datasheet.ciiva.com/16733/95293-16733007.pdf?src-supplier=Avnet+Europe, ComponentLink4URL=https://datasheet.ciiva.com/16733/95293-16733007.pdf?src-supplier=Avnet+Europe, Connector Type="Male Pin", Contact Material=Bronze, Contact Mating Length=0.23inch, Contact Plating=Tin, Contact Type="Male Pin", Depth=2.4mm, Housing Color=Black, Housing Material=Thermoplastic, Lead Free="Lead Free", Length=15.24mm, Manufacturer Part Number=95293-401A06LF, Mount="Surface Mount", Number of Contacts=6, Number of Positions=6, Number of Rows=1, Orientation=Straight, Packaging="Tape and Reel", Pitch=2.54mm, Pricing 1="1=3.32000, 10=3.01700, 100=2.65840 (USD)", Radiation Hardening=No, RoHS=Yes, RoHS Compliant=Yes, Series="BERGSTIK®, MezzSelect™, Basics+", Stock 1=8979, Supplier 1=Digi-Key, Termination=Solder
J10: "Conn Shrouded Header HDR 8 POS 2.54mm Solder RA Thru-Hole SL™ Tube", Color=Black, Contact Resistance=15mR, Manufacturer=Molex, Max Operating Temperature=105°C, Min Operating Temperature=-40°C, Supplier Part Number 1=WM20418-ND, Category="Headers and Wire Housings", ComponentLink1Description=http://components.arrow.com/part/dataview/2934385S6164661N3303?src-supplier=Arrow+Electronics, ComponentLink1URL=http://components.arrow.com/part/dataview/2934385S6164661N3303?src-supplier=Arrow+Electronics, ComponentLink2Description=http://www.molex.com/pdm_docs/sd/705510001_sd.pdf?src-supplier=Digi-Key, ComponentLink2URL=http://www.molex.com/pdm_docs/sd/705510001_sd.pdf?src-supplier=Digi-Key, Connector Type="Male Pin", Contact Material="Copper Alloy", Contact Mating Length=0.24inch, Contact Plating=Gold, Depth=13.59mm, Fastening Type=Latch, Housing Color=Black, Housing Material=Polyester, Manufacturer Part Number=0705510042, Mount="Through Hole", Number of Positions=8, Number of Rows=1, Orientation="Right Angle", Packaging=Rail/Tube, Pitch=0.1inch, Pricing 1="1=2.63000, 10=2.31400, 100=1.84100, 1000=1.52539, 5000=1.36759 (USD)", RoHS=Yes, Supplier 1=Digi-Key, Termination=Solder
J11: "CONN HEADER R/A 6POS 2.54MM", Color=Black, Contact Resistance=15mR, Manufacturer=Molex, Max Operating Temperature=105°C, Min Operating Temperature=-40°C, Package Quantity=1120, Supplier Part Number 1=WM21002-ND, Category="Headers and Wire Housings", ComponentLink1Description=http://components.arrow.com/part/dataview/2934387S8722778N3303?src-supplier=Arrow+Electronics, ComponentLink1URL=http://components.arrow.com/part/dataview/2934387S8722778N3303?src-supplier=Arrow+Electronics, ComponentLink2Description=https://www.molex.com/pdm_docs/sd/705510001_sd.pdf?src-supplier=Digi-Key, ComponentLink2URL=https://www.molex.com/pdm_docs/sd/705510001_sd.pdf?src-supplier=Digi-Key, Connector Type="Male Pin", Contact Material="Copper Alloy", Contact Mating Length=0.24inch, Contact Plating=Gold, Depth=13.59mm, Fastening Type=Latch, Housing Color=Black, Housing Material=Polyester, Manufacturer Part Number=0705510040, Mount="Through Hole", Number of Contacts=6, Number of Positions=6, Number of Rows=1, Orientation="Right Angle", Packaging=Rail/Tube, Pitch=2.54mm, Pricing 1="1=2.52000, 28=2.14929, 84=1.77560, 952=1.40175, 4900=1.24600 (USD)", Radiation Hardening=No, RoHS=Yes, Stock 1=1707, Supplier 1=Digi-Key, Termination=Solder
L1 L2: library part SPM5012T-100M-LR, "FIXED IND 10UH 1.3A 390.5MOHM SM", Case/Package=Nonstandard, Current Rating=1.3A, DC Resistance (DCR)=390.5mR, Manufacturer=TDK, Max Operating Temperature=125°C, Min Operating Temperature=-40°C, Resistor Type=Wirewound, Saturation Current=2.2A, Supplier Part Number 1=445-174487-1-ND, Test Frequency=100kHz, Tolerance=20%, Category="Fixed Inductors", ComponentLink1Description=https://product.tdk.com/info/en/catalog/datasheets/inductor_commercial_power_spm5012-lr_en.pdf?src-supplier=Digi-Key, ComponentLink1URL=https://product.tdk.com/info/en/catalog/datasheets/inductor_commercial_power_spm5012-lr_en.pdf?src-supplier=Digi-Key, Core Material=Metal, Height - Seated (Max)=0.047inch, Inductance=10uH, Length=0.126inch, Manufacturer Part Number=SPM5012T-100M-LR, Mount="Surface Mount", Packaging="Tape and Reel", Pricing 1="1=1.50000, 10=1.39400, 25=1.28720, 50=1.07240, 100=1.00820, 250=0.90088, 500=0.77220 (USD)", RoHS=Yes, RoHS Compliant=Yes, Shielding=Shielded, Stock 1=765, Supplier 1=Digi-Key, Width=0.118inch
Q1 Q2 Q3: "MOSFET N-CHANNEL 60V (D-S)", Manufacturer=Vishay, Supplier Part Number 1=80AH8959, Manufacturer Part Number=SQ2308CES-T1_BE3, Pricing 1="1=0.64000, 25=0.50800, 50=0.45700, 100=0.40600, 250=0.36300, 500=0.31900 (USD)", RoHS=No, Stock 1=2862, Supplier 1=Avnet
R1 R4 R6 R7: library part RC1210FR-07560RL, "RES 560 OHM 1% 1/2W 1210", Case/Package=1210, Case Code (Metric)=3225, Manufacturer=Yageo, Max Operating Temperature=155°C, Max Power Dissipation=500mW, Min Operating Temperature=-55°C, Resistor Type="Thick Film", Supplier Part Number 1=13-RC1210FR-07560RLCT-ND, Temperature Coefficient=100ppm/°C, Tolerance=1%, Voltage Rating=200V, Case Code (Imperial)=1210, Category="Chip SMD Resistors", ComponentLink1Description=https://datasheet.ciiva.com/12575/pyu-rc1210-51-rohs-l-4-12575621.pdf?src-supplier=Mouser, ComponentLink1URL=https://datasheet.ciiva.com/12575/pyu-rc1210-51-rohs-l-4-12575621.pdf?src-supplier=Mouser, Construction=Rectangular, Depth=2.6mm, Features="Moisture Resistant", Height=0.024inch, Lead Free="Lead Free", Length=3.1mm, Manufacturer Part Number=RC1210FR-07560RL, Military Standard=Not, Number of Terminations=2, Packaging="Tape and Reel", Power Rating=500mW, Pricing 1="1=0.17000, 10=0.14900, 100=0.05740, 1000=0.02525, 2500=0.02181 (USD)", Resistance=560R, RoHS=Yes, RoHS Compliant=Yes, Series=RC, Size Code=1210, Supplier 1=Digi-Key, Termination=SMD/SMT, Width=2.6mm
R2: library part RT0603BRE0714KL, "RES SMD 0603 14kOhm 0.1% Paper T/R", Case/Package=0603, Manufacturer=Yageo, Max Operating Temperature=155°C, Max Power Dissipation=100mW, Min Operating Temperature=-55°C, Resistance=14kR, Resistor Type="Thin Film", Supplier Part Number 1=RT0603BRE0714KL-ND, Temperature Coefficient=50ppm/°C, Tolerance=0.1%, Voltage Rating (DC)=50V, Category="Chip SMD Resistors", ComponentLink1Description=http://components.arrow.com/part/dataview/0323_03292491?src-supplier=Arrow+Europe, ComponentLink1URL=http://components.arrow.com/part/dataview/0323_03292491?src-supplier=Arrow+Europe, ComponentLink2Description=http://www.yageo.com/documents/recent/PYu-RT_1-to-0.01_RoHS_L_9.pdf?src-supplier=Digi-Key, ComponentLink2URL=http://www.yageo.com/documents/recent/PYu-RT_1-to-0.01_RoHS_L_9.pdf?src-supplier=Digi-Key, Construction=Rectangular, Depth=0.8mm, Lead Free="Lead Free", Length=1.6mm, Manufacturer Part Number=RT0603BRE0714KL, Military Standard=Not, Number of Terminations=2, Packaging="Tape and Reel", Power Rating=100mW, Pricing 1="5000=0.04543 (USD)", RoHS=Yes, RoHS Compliant=Yes, Series=RT, Supplier 1=Digi-Key, Width=800um
R3 R5 R8 R9 R10 R17 R18 R19 R20: library part 0805W8F1002T5E, "±1% 1/8W Thick Film Resistors 150V ±100ppm/℃ -55℃~+155℃ 10kΩ 0805 Chip Resistor - Surface Mount ROHS", Manufacturer=UNI-ROYAL, Package=0805, Manufacturer Part No=0805W8F1002T5E
R11 R14: library part 0201WMF5102TEE, "51kΩ 0201 Chip Resistor", Manufacturer="Uni Royal", ComponentLink1Description="New link", ComponentLink1URL=https://www.lcsc.com/product-detail/Chip-span-style-background-color-ff0-Resistor-span-Surface-Mount_UNI-ROYAL-Uniroyal-Elec-0201WMF5102TEE_C473471.html, Manufacturer Part No=0201WMF5102TEE
R12 R15: library part 0201WMF7153TEE, "715kΩ 0201 Chip Resistor", Manufacturer="Uni Royal", ComponentLink1Description="New link", ComponentLink1URL=https://www.lcsc.com/product-detail/Chip-Resistor-Surface-Mount_UNI-ROYAL-Uniroyal-Elec-0201WMF7153TEE_C620454.html, Manufacturer Part No=0201WMF7153TEE
R13 R16: library part NQ01WMJ0133TEE, "13kΩ 0201 Chip Resistor", Manufacturer="Uni Royal", ComponentLink1Description="New link", ComponentLink1URL=https://lcsc.com/product-detail/Chip-Resistor-Surface-Mount_UNI-ROYAL-Uniroyal-Elec-NQ01WMJ0133TEE_C965341.html, Manufacturer Part No=NQ01WMJ0133TEE
SW1 SW2 SW3 SW4 SW5: "5.1mm 3.5mm Round Button 50mA To 5.1mm SPST 12V SMD Tactile Switche", Manufacturer=XKB, Package=Custom, ComponentLink1Description=LCSC, ComponentLink1URL=https://lcsc.com/product-detail/Tactile-Switches_XKB-Enterprise-TS-1187A-C-G-A_C318886.html, Manufacturer Part No=TS-1187A-C-G-B
U1: "IC REG LINEAR 5V 500MA SOT223-4", Case/Package=SOT-223-4, Dropout Voltage=2V, Manufacturer="Texas Instruments", Max Input Voltage=25V, Max Operating Temperature=125°C, Max Output Current=500mA, Min Input Voltage=7V, Min Operating Temperature=-40°C, Nominal Output Voltage=5V, Package Quantity=1, Power Supply Rejection Ratio (PSRR)=80dB, Quiescent Current=4.5mA, Supplier Part Number 1=296-17616-6-ND, Category="Voltage Regulators - Linear", ComponentLink1Description=https://datasheet.ciiva.com/46429/1849874-46429894.pdf?src-supplier=Element14, ComponentLink1URL=https://datasheet.ciiva.com/46429/1849874-46429894.pdf?src-supplier=Element14, ComponentLink2Description=https://datasheet.ciiva.com/14274/ua78m05-14274743.pdf?src-supplier=Avnet, ComponentLink2URL=https://datasheet.ciiva.com/14274/ua78m05-14274743.pdf?src-supplier=Avnet, ComponentLink3Description=https://datasheet.ciiva.com/2042/ua78m05-2042251.pdf?src-supplier=Digi-Key, ComponentLink3URL=https://datasheet.ciiva.com/2042/ua78m05-2042251.pdf?src-supplier=Digi-Key, ComponentLink4Description=https://datasheet.ciiva.com/2042/ua78m05-2042252.pdf?src-supplier=Digi-Key, ComponentLink4URL=https://datasheet.ciiva.com/2042/ua78m05-2042252.pdf?src-supplier=Digi-Key, ComponentLink5Description=https://datasheet.ciiva.com/2042/ua78m05-2042253.pdf?src-supplier=Digi-Key, ComponentLink5URL=https://datasheet.ciiva.com/2042/ua78m05-2042253.pdf?src-supplier=Digi-Key, Lead Free="Lead Free", Manufacturer Part Number=UA78M05IDCYR, Mount="Surface Mount", Number of Outputs=1, Number of Pins=4, Number of Regulators=1, Output Current=500mA, Output Type=Fixed, Output Voltage=5V, Packaging="Tape and Reel", Polarity=Positive, Pricing 1="1=0.80000, 10=0.70000, 25=0.65720, 100=0.53640, 250=0.49820, 500=0.42400, 1000=0.35000 (USD)", REACH SVHC="No SVHC", RoHS=Yes, RoHS Compliant=Yes, Series=-, Supplier 1=Digi-Key, Weight=0.006632oz
U2: "OPTOISOLTR 5KV 4CH TRANS 16-SMD", Case/Package=SMD/SMT, Collector-emitter Voltage-Max=200mV, Collector Emitter Voltage (VCEO)=35V, Current Transfer Ratio=300%, Forward Current=50mA, Forward Voltage=1.4V, Isolation Voltage=5kV, Manufacturer="Vishay Lite-On", Max Operating Temperature=100°C, Max Power Dissipation=200mW, Min Operating Temperature=-30°C, Package Quantity=25, Supplier Part Number 1=5600457, Category=Optocouplers, Collector Emitter Saturation Voltage=200mV, ComponentLink1Description=https://datasheet.ciiva.com/11772/0900766b80de6b5f-11772471.pdf?src-supplier=RSComponents, ComponentLink1URL=https://datasheet.ciiva.com/11772/0900766b80de6b5f-11772471.pdf?src-supplier=RSComponents, ComponentLink2Description=https://datasheet.ciiva.com/15118/getdatasheetpartid-141775-15118788.pdf?src-supplier=Verical, ComponentLink2URL=https://datasheet.ciiva.com/15118/getdatasheetpartid-141775-15118788.pdf?src-supplier=Verical, ComponentLink3Description=https://datasheet.ciiva.com/2086/s-110-ltv-814824844m-s-s-ta-s-ta1-s-tpseries-2086434.pdf?src-supplier=Digi-Key, ComponentLink3URL=https://datasheet.ciiva.com/2086/s-110-ltv-814824844m-s-s-ta-s-ta1-s-tpseries-2086434.pdf?src-supplier=Digi-Key, ComponentLink4Description=https://datasheet.ciiva.com/15957/ltv-8x4-15957686.pdf?src-supplier=Onlinecomponents.com, ComponentLink4URL=https://datasheet.ciiva.com/15957/ltv-8x4-15957686.pdf?src-supplier=Onlinecomponents.com, ComponentLink5Description=https://datasheet.ciiva.com/26923/getdatasheetpartid-757770-26923467.pdf?src-supplier=Verical, ComponentLink5URL=https://datasheet.ciiva.com/26923/getdatasheetpartid-757770-26923467.pdf?src-supplier=Verical, Fall Time=18000ns, Input Type=AC, Isolation Voltage-Max=5kV, Lead Free="Lead Free", Manufacturer Part Number=LTV-844S, Max Collector Current=50mA, Max Input Current=50mA, Max Output Voltage=35V, Mount="Surface Mount", Number of Channels=4, Number of Circuits=4, Number of Elements=4, Number of Pins=16, Output Current per Channel=50mA, Output Voltage=35V, Packaging=Rail/Tube, Power Dissipation=200mW, Pricing 1="25=0.90500 (USD)", Radiation Hardening=No, Rise Time=18000ns, RoHS=Yes, RoHS Compliant=Yes, Series=-, Stock 1=1400, Supplier 1="Future Electronics"
U3: "DC5-24V Wireless WIFI LED RGB Controller RGBW Controller IR / RF Remote Control IOS/Android for LED Strip RGB RGBW RGBWW", Manufacturer=Tasmota, Package=Custom, ComponentLink1Description="Supplier Link", ComponentLink1URL=https://tasmota.github.io/docs/devices/MagicHome-with-ESP8285/#, Manufacturer Part No=ESP8285
U4 U5: "IC REG BOOST ADJ 2A SOT23-5", Case/Package=SOT-23-5, Manufacturer="TI National Semiconductor", Max Input Voltage=14V, Max Operating Temperature=125°C, Max Output Current=1.4A, Max Output Voltage=20V, Min Input Voltage=2.7V, Min Operating Temperature=-40°C, Min Output Voltage=3V, Package Quantity=1000, Quiescent Current=2mA, Supplier Part Number 1=LMR62014XMF/NOPBCT-ND, Switching Frequency=1.6MHz, Category="Power Supply Modules", ComponentLink1Description=https://datasheet.ciiva.com/3231/lmr62014-3231410.pdf?src-supplier=Avnet, ComponentLink1URL=https://datasheet.ciiva.com/3231/lmr62014-3231410.pdf?src-supplier=Avnet, ComponentLink2Description=https://datasheet.ciiva.com/23854/1777788-23854326.pdf?src-supplier=Newark, ComponentLink2URL=https://datasheet.ciiva.com/23854/1777788-23854326.pdf?src-supplier=Newark, ComponentLink3Description=https://datasheet.ciiva.com/4879/snvs735a-74121-4879731.pdf?src-supplier=Mouser, ComponentLink3URL=https://datasheet.ciiva.com/4879/snvs735a-74121-4879731.pdf?src-supplier=Mouser, ComponentLink4Description=https://datasheet.ciiva.com/22669/1716576-22669414.pdf?src-supplier=Element14, ComponentLink4URL=https://datasheet.ciiva.com/22669/1716576-22669414.pdf?src-supplier=Element14, ComponentLink5Description=https://datasheet.ciiva.com/6603/lmr62014-6603804.pdf?src-supplier=Digi-Key, ComponentLink5URL=https://datasheet.ciiva.com/6603/lmr62014-6603804.pdf?src-supplier=Digi-Key, ComponentLink6Description=https://datasheet.ciiva.com/6603/lmr62014-6603807.pdf?src-supplier=Digi-Key, ComponentLink6URL=https://datasheet.ciiva.com/6603/lmr62014-6603807.pdf?src-supplier=Digi-Key, Contact Plating=Tin,Matte, Lead Free="Lead Free", Manufacturer Part Number=LMR62014XMF/NOPB, Mount="Surface Mount", Number of Outputs=1, Number of Pins=5, Output Configuration=Positive, Output Current=1.4A, Output Type=Adjustable, Output Voltage=20V, Packaging="Tape and Reel", Pricing 1="1=0.96000, 10=0.86000, 25=0.81600, 100=0.67040, 250=0.62672, 500=0.55384 (USD)", Radiation Hardening=No, REACH SVHC="No SVHC", RoHS=Yes, Stock 1=5493, Supplier 1=Digi-Key, Synchronous Rectifier=No, Topology=Boost

## Free pads (board coordinates)
  round 115 hole 55 square: MH1(629,1919) MH2(2759,1919) MH3(2925,74) MH4(629,74)

## Via types
v1: diameter 62.99, hole 31.5, Top Layer to Bottom Layer, tented both sides, 20 vias
v2: diameter 23.62, hole 11.81, Top Layer to Bottom Layer, tented both sides, 17 vias
v3: diameter 50, hole 28, Top Layer to Bottom Layer, 10 vias
v4: diameter 62.99, hole 32.99, Top Layer to Bottom Layer, tented both sides, 5 vias
v5: diameter 62.99, hole 32.49, Top Layer to Bottom Layer, tented both sides, 2 vias

## Nets (pads, with @x,y where several pads share a name; then routed paths per layer and width w, separated by ;. In a path a pad name is that pad's centre, name@x,y a point inside that pad or via, vN(x,y) a via of type N, cw(c..) or ccw(c..) an arc to the next point about the centre after c; other vN are vias at no path point)
AN_1: J10.1 R1.1 | length 1094.9
  Top Layer w25: v3(652,1761.5) 676.5,1786 R1.1@713,1786
  Bottom Layer w20: J10.1 753,1084 783,1114 783,1708.5 730,1761.5 v3(652,1761.5)
AN_2: J10.3 R4.1 | length 1183
  Top Layer w20: R4.1 720,1586 R4.1@721,1585
  Top Layer w25: J10.3 437,1284 396,1325 396,1798.87 440,1842.87 573.13,1842.87 595,1821 595,1618 627,1586 R4.1
AN_3: J10.5 R6.1 | length 236.2
  Top Layer w25: v3@613,1387 613.45,1386.55 648.01,1386.55 R6.1
  Bottom Layer w25: J10.5 519.16,1478.92 606,1392.08 v3(606,1387)
AN_4: J10.7 R7.1 | length 705.2
  Top Layer w25: v3(653,1240) 653,1200.64 667.64,1186 R7.1
  Bottom Layer w12: J10.7 626,1684 695,1615 695,1282 v3(653,1240)
BLUE: IC1.23 U3.6 | length 1223.3
  Top Layer w12: v2(1773,961) 1773,1192 1852.39,1271.39 IC1.23
  Bottom Layer w25: U3.6 1203.21,523.21 1641,961 v2(1773,961)
BOOST1: C6.1 C7.1 D2.2 J2.8 R12.2 | length 1194.4
  Top Layer w10: R12.2@2251.02,1579.23 R12.2
  Top Layer w25: D2.2 C7.1@2387,1496.42
  Top Layer w50: v1(2930,739) J2.8
  Bottom Layer w50: v5(2453,1457) 2518.55,1457 2930,1045.55 v1(2930,739)
BOOST2: C8.1 C9.1 D3.2 J2.9 R15.2 | length 1257
  Top Layer w25: C9.1 2422.89,1167.43 D3.2
  Top Layer w50: v1(2849.44,817.44) J2.9
  Bottom Layer w50: v1(2241,984) 2241,1058 v1(2423,1240) ; v1@2421,1242 2423,1244 v1@2849.5,817.5
CAT_1: J10.2 U2.2 | length 977.4
  Top Layer w20: U2.2@971,1788 U2.2@971,1790
  Top Layer w25: v3@727,1686 869,1686 U2.2@971,1788
  Bottom Layer w20: J10.2 682,1184 729,1231 729,1688 v3(727,1690)
CAT_2: J10.4 U2.4 | length 565
  Top Layer w20: J10.4 621.16,1486 881,1486 908,1513 908,1562 934,1588 U2.4@971,1588
CAT_3: J10.6 U2.6 | length 809
  Top Layer w25: J10.6 521.87,1584 574.87,1531 v3(617,1531) ; v3(606,1285) 607,1286 868,1286 U2.6
  Bottom Layer w25: v3(606,1285) 659,1338 659,1484.61 617,1526.61 v3(617,1531)
CAT_4: J10.8 U2.8 | length 1128.9
  Top Layer w25: U2.8 v2(1024,1186)
  Bottom Layer w12: J10.8 534.66,1799.5 935.5,1799.5 1024,1711 v2(1024,1186)
FB1: C6.2 R12.1 R13.1 U4.3 | length 2.2
  Top Layer w10: R13.1 R13.1@2107.36,1555.61 ; R12.1@2251.02,1555.61 R12.1 ; U4.3@2252,1502 U4.3
FB2: C8.2 R15.1 R16.1 U5.3 | length 0.8
  Top Layer w12: U5.3@2344.06,1032 U5.3
FET_1: J2.5 J2.12 Q1.3 | length 1149.8
  Top Layer w50: Q1.3@2886.68,1132.4 Q1.3 2945.52,1133.48 3025.34,1053.66 J2.12 3222.34,1053.66 3342,934 3342,619 3225.48,502.48 J2.5
FET_2: J2.6 J2.11 Q2.3 | length 1082
  Top Layer w50: Q2.3 v1@2984,378.12 ; v1(2984,581) 2984.22,581.22 J2.6 3198.22,581.22 3284,667 3284,888 3197.08,974.92 J2.11
  Bottom Layer w50: v1(2984,378) v1(2984,581)
FET_3: J2.7 J2.10 Q3.3 | length 634.8
  Top Layer w50: Q3.3 Q3.3@2886.38,659.22 ; 2903,659.96 J2.7 3176.96,659.96 3227,710 3227,848 3178.82,896.18 J2.10
FUSE_OUT: C4.1 C5.1 C10.1 C11.1 F1.2 L1.2 L2.2 R11.1 R14.1 U4.5 U5.5 | length 490
  Bottom Layer w50: v1(2170,1281) 2203.63,1314.63 2551.29,1314.63 F1.2
GND: C1.2 C2.2 C3.2 C4.2 C5.2 C7.2 C9.2 C10.2 C11.2 C12.2 C13.2 C14.2 C15.2 C16.2 C17.2 C18.2 C19.2 IC1.8 IC1.19 J1.2 J1.3 J1.4 J1.5 J3.3 J11.1 pad.MH1 pad.MH2 pad.MH3 pad.MH4 Q1.2 Q2.2 Q3.2 R3.2 R5.1 R9.1 R10.1 R13.2 R16.2 SW1.3 SW1.4 SW2.3 SW2.4 SW3.3 SW3.4 SW4.3 SW4.4 SW5.3 SW5.4 U1.2 U1.4 U2.9 U2.11 U2.13 U2.15 U3.1 U4.2 U5.2 | length 9919.3
  Top Layer w12: IC1.8 1700.2,1220.2 1713,1233 ; IC1.19 C13.2@1998,1169.02 ; R13.2 2181.41,1533.59 2201,1514 2201,1478 2217,1462 ; C4.2 2220.5,1333.11 C5.2 2219.21,1363.71 2219.21,1459.79 2217,1462 ; U4.2 2251.79,1462 2217,1462 ; R16.2 2311.83,961.83 2333,983 2367,983 2384,1000 2384,1008.36 U5.2
  Top Layer w20: SW5.4@745.89,194.82 982.11,194.82 v4@982.11,147.11 ; SW4.4@745.89,411.82 982.11,411.82 982.11,364.11 ; SW3.4@745.89,629.82 982.11,629.82 982.11,582.11 ; SW2.4@745.89,847.82 982.11,847.82 982.11,800.11 ; 982,1017 982.11,1017.11 SW1.3@982.11,1064.82 ; U4.2 2292.88,1462.42 C7.2 ; C9.2 2373.57,1107.43 2384,1097 U5.2 ; 2384,1008.36 2397.93,994.43 2484,994.43 C11.2 2490.69,993.81 C10.2 ; Q2.2 2923,245 R10.1 ; Q3.2 2923,526 R5.1 ; Q1.2 2923,1001 R9.1
  Top Layer w25: 1713,1233 1728,1248 v1(1728,1282)
  Top Layer w50: v1(1246.33,1186) U2.9 ; v1(1246.33,1386) U2.11 ; v1(1246.33,1586) U2.13 ; v1(1246.33,1786) U2.15 ; v1@1698,1786 1699,1787 J3.3